# Altium PCB extension.PcbDoc (part 2 of 3)
Units mil, origin at the board's own origin, x right, y up, seen from the top; angles counter-clockwise.
Board outline 6141.73 x 4724.41 mil, 4 copper layers (Top Copper, Supply, GND, Bot Copper), stack 61.417 mil thick; 231 components, 147 nets, 660 pads, 234 vias.
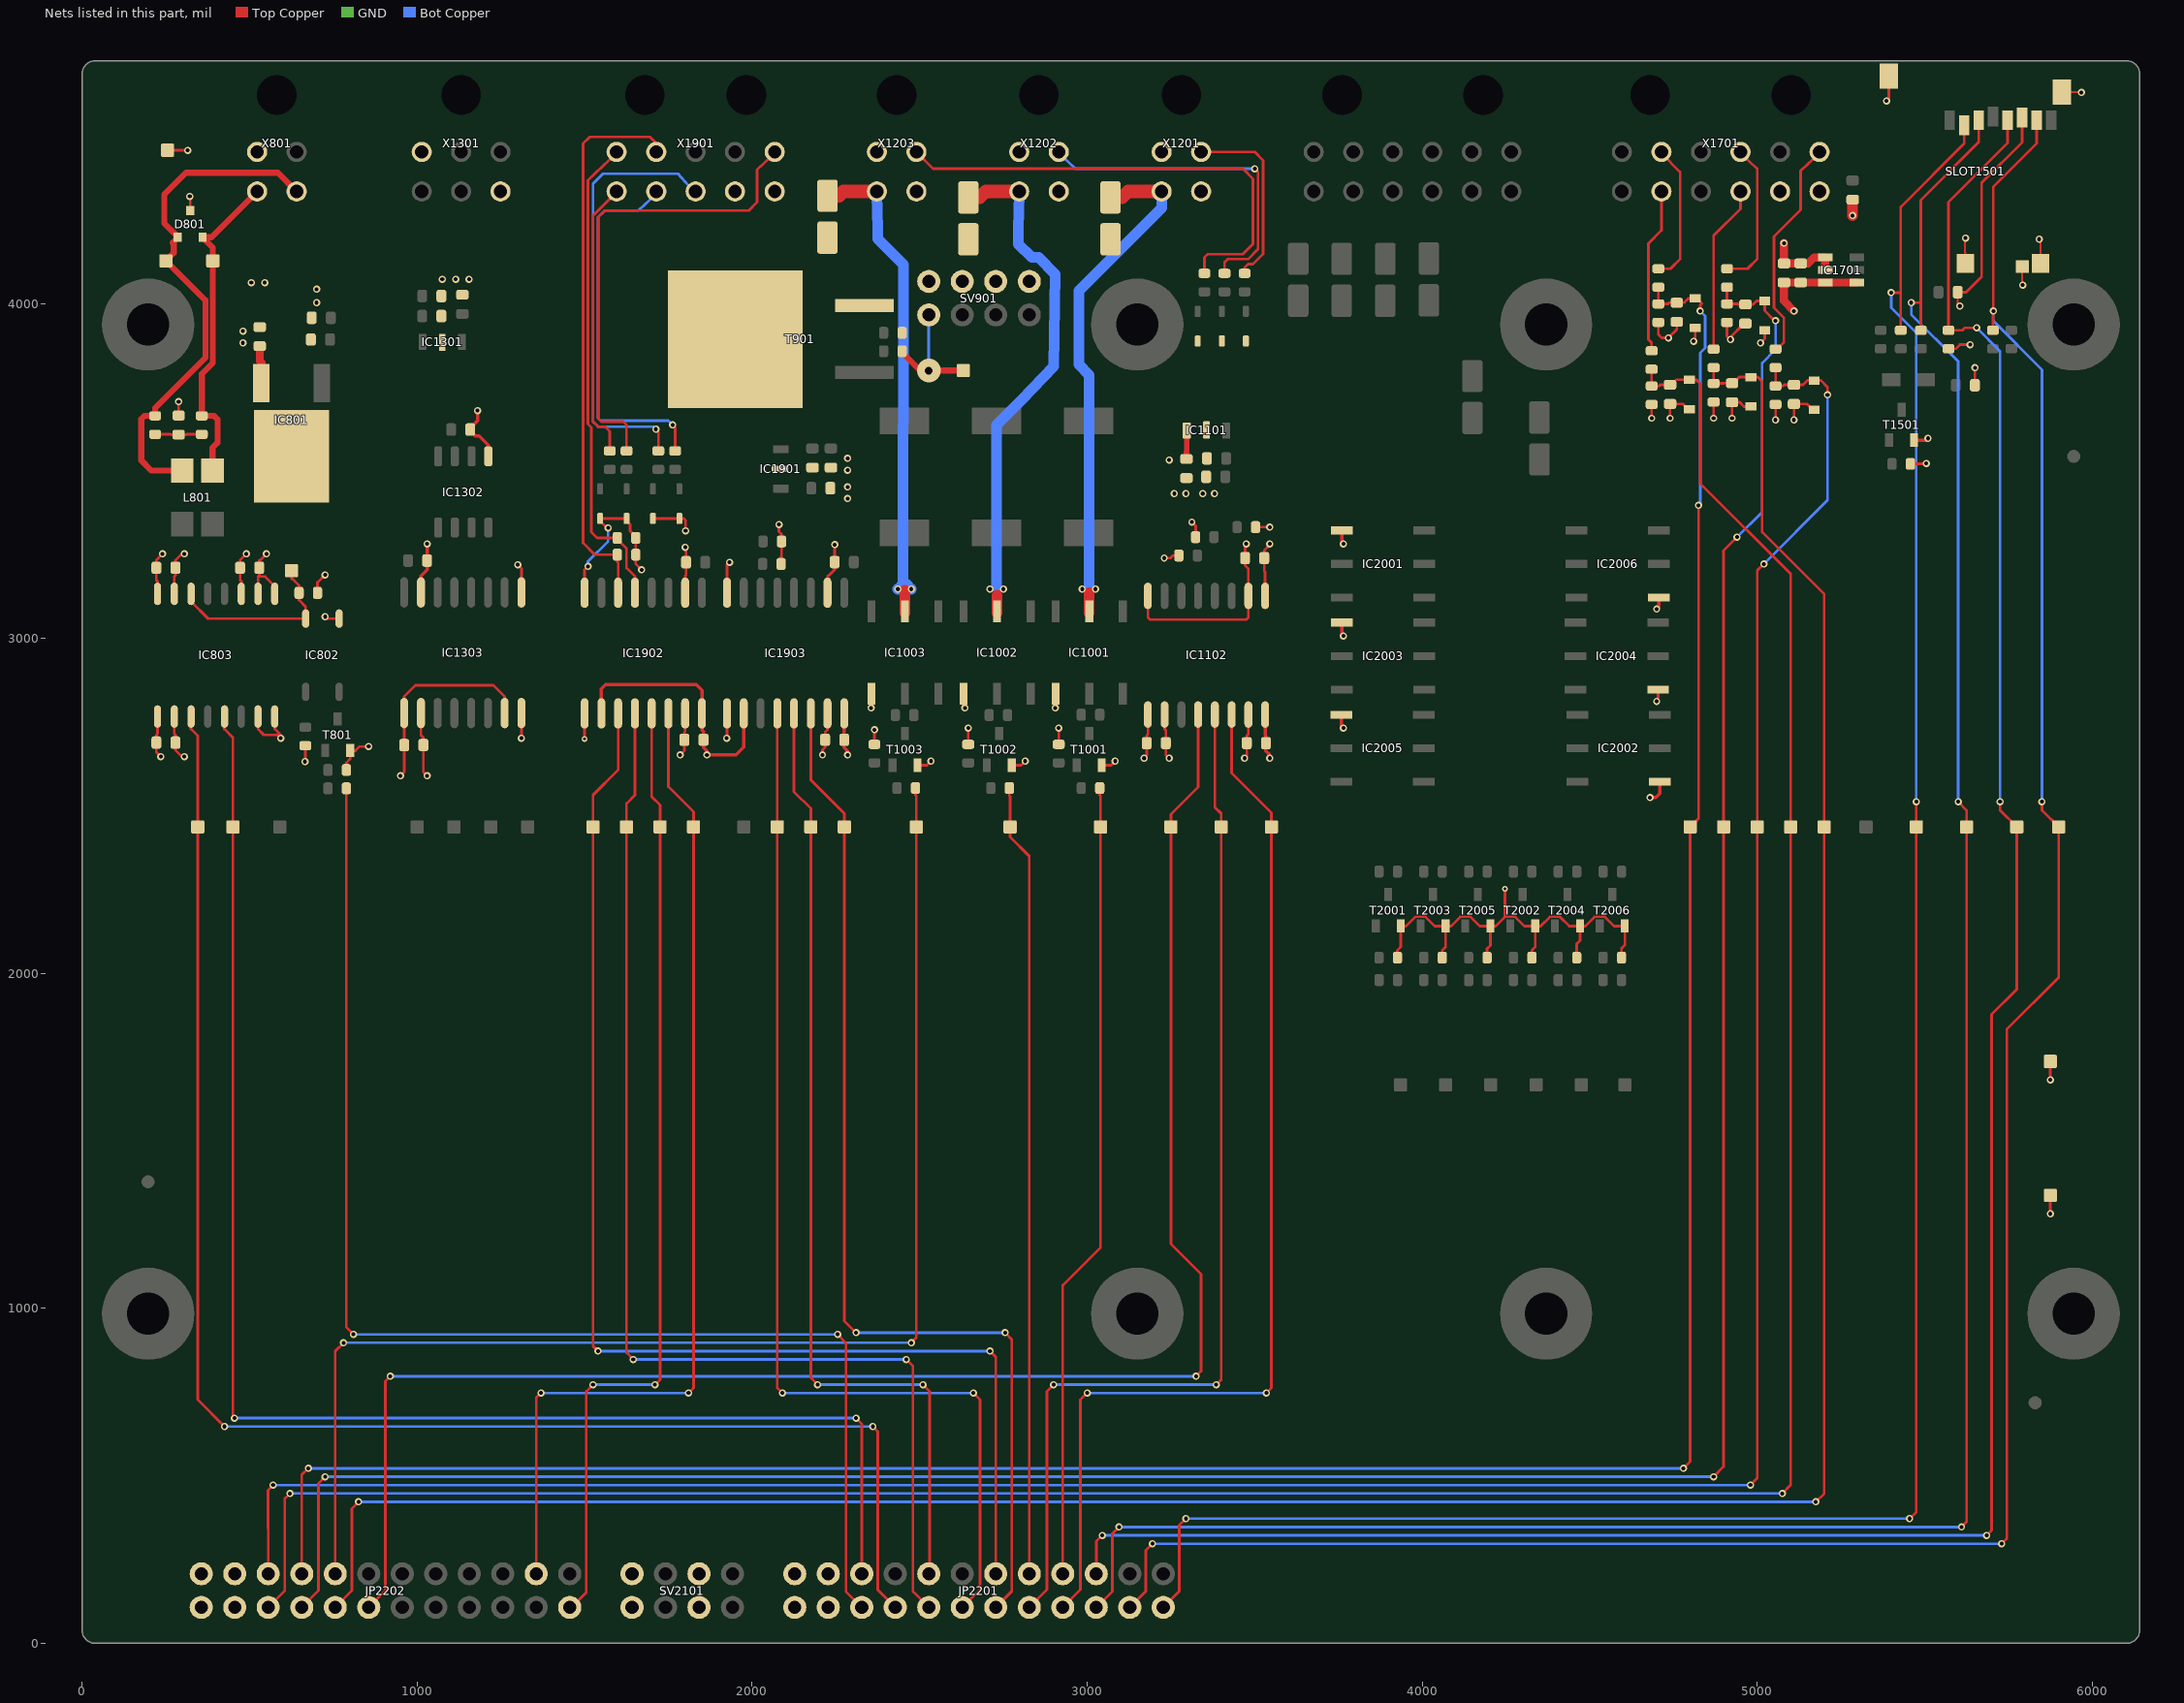
[diagram p4: the nets of this part, all layers, seen from the top]

## Part data
C801 C1102 C1301 C1502 C1703 C1902: library part gen_C_ceramic_1u_50V_X7R_0603, "MLCC", Capacitance=1u, Case EIA=0603, Case Metric=1608, Dielectric=X7R, Operating Temperature="-55°C - +125°C", Rated Voltage=50V, Supplier Part Number 1=2779055, Tolerance="± 10%", Part Number=gen_C_ceramic_1u_50V_X7R_0603, Supplier 1=Farnell
C802 C803 C805 C806 C807 C1101 C1103 C1104 C1105 C1106 C1302 C1303 C1304 C1305 C1306 C1501 C1701 C1702 C1704 C1705 C1706 C1707 C1708 C1901 C1903 C1904 C1905 C1906 C1907: library part gen_C_ceramic_100n_50V_X7R_0603, "MLCC", Capacitance=100n, Case EIA=0603, Case Metric=1608, Dielectric=X7R, PnP Package=C_0603_10, PnP Value=100n/50V/X7R, Rated Voltage=50V, Supplier Part Number 1=2525267, Part Number=gen_C_ceramic_100n_50V_X7R_0603, PnP equipped=x, Supplier 1=Farnell
C804: library part gen_C_ceramic_4n7_50V_X7R_0603, "MLCC", Capacitance=4n7, Case EIA=0603, Case Metric=1608, Dielectric=X7R, PnP Package=C_0603_05, Rated Voltage=50V, Supplier Part Number 1=2904754, Automotive Qualified=True, Part Number=gen_C_ceramic_4n7_50V_X7R_0603, Supplier 1=Farnell
D801: library part CMP-2000-04916-1, "CAN Bus ESD Protection Diode, 200 W, 24 V, -65 to 150 degC, 3-Pin SOT23, RoHS, Tape and Reel", Breakdown Voltage=27.8V, Breakdown Voltage Max=30.3V, Breakdown Voltage Min=25.4V, Breakdown Voltage Range=25.4Vto30.3V, Capacitance Cd @ Vr Max=17pF, Capacitance Cd @ Vr Typ=11pF, Clamping Voltage @ 8/20µs Max=70V, Diode Case Style=SOT-23, Manufacturer="NXP Semiconductors", Operating Temperature Max=150degC, Operating Temperature Min=-65degC, Operating Temperature Range=-65degCto+150degC, Peak Pulse Current Ippm=3A, Peak Pulse Power=200W, Reverse Stand-Off Voltage Vrwm=24V, Breakover Voltage Min=25.4V, Clamping Voltage Vc Max=70V, Datasheet URL=https://datasheet.ciiva.com/22692/109497-22692467.pdf, Datasheet Version="Rev. 04, 02/2008", Diode Configuration=Bidirectional, Diode Type=BidirectionalTVS, Manufacturer URL=http://www.nxp.com/, No. of Pins=3, Package / Case=SOT-23, SMD Marking=AN, Stand-off Voltage=24V, SVHC=NoSVHC(20-Jun-2013), Termination Type=SMD, TVS Polarity=Bidirectional
D1001 D1002 D1003 D2001 D2002 D2003 D2004 D2005 D2006: "Standard Recovery Diode, 100 V, 1 A, Single, 1 V, 2 µs, 30 A", Breakdown Voltage=100V, Continuous Forward Current=1A, Manufacturer="ON Semiconductor", Operating Temperature="-65°C - +175°C", Part Name=GF1B, Supplier Part Number 1=1467477, ComponentLink1Description=Datasheet, ComponentLink1URL=http://www.farnell.com/datasheets/2303965.pdf, Part Number=d_si_sma_1A, Supplier 1=Farnell
D1101 D1102 D1103 D1901 D1902 D1903 D1904: "TVS Diode, CDSOD323 Series, Unidirectional, 5 V, 18.3 V, SOD-323, 2 Pins", Breakdown Voltage=6V, Manufacturer=Bourns, Operating Temperature="-55°C - +150°C", Supplier Part Number 1=2341914, ComponentLink1Description=Datasheet, ComponentLink1URL=http://www.farnell.com/datasheets/1845299.pdf, Part Name=CDSOD323-T05, Part Number=CDSOD323-T05, Supplier 1=Farnell
D1701 D1702 D1703 D1704 D1705: library part CMP-1060-00652-1, "Zener Voltage Regulator, 300 mW, Tight Tolerance Portfolio, 2-Pin SOD-323, Pb-Free, Tape and Reel", Manufacturer="On Semiconductor", ComponentLink1Description="Manufacturer URL", ComponentLink1URL=http://www.onsemi.com/, ComponentLink2Description=Datasheet, ComponentLink2URL=http://www.onsemi.cn/pub_link/Collateral/MM3Z2V4ST1-D.PDF, ComponentLink3Description="Package Specification", ComponentLink3URL=http://www.onsemi.com/pub_link/Collateral/477-02.PDF.1, DatasheetVersion="Rev. 21", Mounting Technology="Surface Mount", PackageDescription="2-Pin SOD, Body 1.7 x 1.25 mm", PackageReference=SOD-323-2-477-02, PackageVersion="Rev. H, 03/2007", Packing="Tape and Reel", PartNumber=MM3Z3V3ST1G, P Max (W)=0.3, RoHS=Pb-Free
Designator24: library part Layer_Marker_4_Layers
Designator30 Designator31 Designator32 Designator33 Designator34 Designator35 Designator36 Designator37: library part Hole_3.2_Iso
F1001 F1002 F1003: library part fuse_4A_3403.0172.11, Manufacturer=Schurter, Operating Temperature="-55°C - +125°C", Supplier Part Number 1=486-1253-ND, ComponentLink1Description="Catalog Page Digikey", ComponentLink1URL=http://dkc3.digikey.com/PDF/DE2011-DE/P2352.pdf, Part Number=fuse_4A_3403.0172.11, Supplier 1=Digikey, Supplier 2=Mouser, Supplier Part Number 2=693-3403.0172.11
FD1 FD2 FD3: library part Fiducial_2, "Fiducial (Round)", PnP Package=FD, PnP Value=Fiducial2, Part Number=Fiducial_2
IC801: library part KA7805ERTF, "3-Terminal 1 A Positive Voltage Regulator", Manufacturer=Fairchild, Operating Temperature="-40°C - +125°C", Supplier Part Number 1=2102585, ComponentLink1Description=Datasheet, ComponentLink1URL=http://www.farnell.com/datasheets/2299720.pdf, Part Name=KA7805ERTF, Part Number=KA7805ERTF, Supplier 1=Farnell
IC802: "Single-Pole, Normally Open 4-Pin SOP OptoMOS Relay", Manufacturer=CLARE, Operating Temperature="-40°C - +85°C", Supplier Part Number 1=1653755, ComponentLink1Description=Datasheet, ComponentLink1URL=http://www.farnell.com/datasheets/1924621.pdf, Part Name=CPC1008N, Part Number=CPC1008N, Supplier 1=Farnell
IC803: library part CMP-2000-07246-1, "Galvanically Isolated High-Speed CAN Transceiver, -40 to 125 degC, 16-Pin SOIC, RoHS, Tape and Reel", Manufacturer=NXPSemiconductors, Maximum Single Supply Voltage=5.25V, Minimum Single Supply Voltage=3, Package=16SOIC, Package Description="16-Pin Small Outline Integrated Circuit, Body 10.3 x 7.5 mm, Pitch 1.27 mm", Package Reference=SOT162-1, Power Down Mode=Standby, Category=Transceiver, Datasheet URL=http://www.nxp.com/documents/data_sheet/TJA1052I.pdf, Datasheet Version="Rev. 3, 01/2015", Manufacturer URL=http://www.nxp.com/, Maximum Data Rate=1Mbps, Mounting Technology=SurfaceMount, Number of Transceivers=1, Packaging=Tape&Reel, Rad Hard=No, Standard Supported=ISO11898-2
IC1001 IC1002 IC1003 IC2001 IC2002 IC2003 IC2004 IC2005 IC2006: "PhotoMOS Relay", Manufacturer=Panasonic, Operating Temperature="-40°C - +85°C", Supplier Part Number 1=255-3594-1-ND, Part Name=AQV252G2SX, Part Number=AQV252G2SX, Supplier 1=Digikey, Supplier 2=Farnell, Supplier Part Number 2=2302216
IC1101 IC1301 IC1901: library part CMP-2000-07341-1, "Positive-Voltage Regulator, 100 mA, 0 to 125 degC, 3-Pin SOT-89 (PK), Green (RoHS & no Sb/Br), Tape and Reel", Input Voltage MAX=20V, Input Voltage MIN=7V, Manufacturer=TexasInstruments, Maximum Operating Temperature=+125C, Minimum Operating Temperature=0C, Output Current=100mA, Output Voltage=5V, Package / Case=SOT-89-4, Package Description="3-Pin Small Outline Transistor, Body 4.5 x 2.5 mm, Pitch 1.5 mm", Package Reference=PK0003A, Brand=TexasInstruments, Datasheet URL=http://www.ti.com/lit/ds/symlink/ua78l05.pdf, Datasheet Version="Rev. U, 05/2011", Line Regulation=200mV, Load Regulation=60mV, Manufacturer URL=http://www.ti.com/, Mounting Style=SMD/SMT, Mounting Technology=SurfaceMount, Number of Outputs=1, Output Type=Fixed, Package URL=http://www.ti.com/lit/ml/mhsi001b/mhsi001b.pdf, Packaging=Reel, Polarity=Positive, Product Category=LinearVoltageRegulators, PSRR / Ripple Rejection - Typ=49dB, RoHS=True, Series=UA78L05
IC1102: library part CMP-0534-00476-1, "Triple Channel Digital Isolator, Enhanced System-Level ESD Reliability, 2.5 KV rms Insulation Rating, 90 Mbps Data Rate, 32 ns Delay, Industrial, 16-pin SOIC (RW-16), Tube", Insulation Rating (kVrms)=2.5, Manufacturer="Analog Devices", Max Operating Temp (degreesC)=105, Code_JEDEC=MS-013-AA, ComponentLink1Description="Manufacturer URL", ComponentLink1URL=http://www.analog.com/en/index.html, ComponentLink2Description=Datasheet, ComponentLink2URL=http://www.analog.com/static/imported-files/data_sheets/ADUM3300_3301.pdf, ComponentLink3Description="Package Specification", ComponentLink3URL=http://www.analog.com/static/imported-files/packages/PKG_PDF/SOIC_WIDE%20%28RW%29/RW_16.pdf, ComponentLink4Description="URL Link1", ComponentLink4URL="Product URL:http://www.analog.com/en/interface-isolation/digital-isolators/adum3300/products/product.html", DatasheetVersion="Rev. B", Max Data Rate=90Mbps, Mounting Technology="Surface Mount", PackageDescription="16-Pin Standard Small Outline Package, Body 10.3 x 7.5 mm, Pitch 1.27 mm", PackageReference=RW-16, PackageVersion="032707-B, 03/2007", PartNumber=ADUM3300CRWZ
IC1302: library part LT1785CS8#PBF, "Transceiver RS422/RS485, Fault Protected, 4.75V-5.25V supply, SOIC-8", Manufacturer="Linear Technology", Operating Temperature="0°C - 70°C", Part Name=LT1785CS8, Supplier Part Number 1=1663498, ComponentLink1Description=Datasheet, ComponentLink1URL=http://www.farnell.com/datasheets/1905888.pdf, Part Number=LT1785CS8#PBF, Supplier 1=Farnell
IC1303: library part CMP-0534-00405-1, "Quad Channel Digital Isolator, Enhanced System-Level ESD Reliability, 2.5 KV rms Insulation Rating, 90 Mbps Data Rate, 32 ns Delay, Industrial, 16-pin SOIC (RW-16), Tube", Insulation Rating (kVrms)=2.5, Manufacturer="Analog Devices", Max Operating Temp (degreesC)=105, Code_JEDEC=MS-013-AA, ComponentLink1Description="Manufacturer URL", ComponentLink1URL=http://www.analog.com/en/index.html, ComponentLink2Description=Datasheet, ComponentLink2URL=http://www.analog.com/static/imported-files/data_sheets/ADUM3400_3401_3402.pdf, ComponentLink3Description="Package Specification", ComponentLink3URL=http://www.analog.com/static/imported-files/packages/PKG_PDF/SOIC_WIDE%20%28RW%29/RW_16.pdf, ComponentLink4Description="URL Link1", ComponentLink4URL="Product URL:http://www.analog.com/en/interface-isolation/digital-isolators/adum3401/products/product.html", DatasheetVersion="Rev. B", Max Data Rate=90Mbps, Mounting Technology="Surface Mount", PackageDescription="16-Pin Standard Small Outline Package, Body 10.3 x 7.5 mm, Pitch 1.27 mm", PackageReference=RW-16, PackageVersion="032707-B, 03/2007", PartNumber=ADUM3401CRWZ
IC1701: library part CMP-0784-00366-1, "Micropower, High Accuracy Voltage Reference, 2.5 V Output, 2.7 to 5.5 V Supply, Industrial, 6-pin SOT23 (RJ-6), Reel", Manufacturer="Analog Devices", Operating Temp Range="-40 to 125 degC", Code_JEDEC=MO-178-AB, ComponentLink1Description="Manufacturer URL", ComponentLink1URL=http://www.analog.com/en/index.html, ComponentLink2Description=Datasheet, ComponentLink2URL=http://www.analog.com/static/imported-files/data_sheets/ADR3412_ADR3420_ADR3425_ADR3430_ADR3433_ADR3440_ADR3450.pdf, ComponentLink3Description="Package Specification", ComponentLink3URL=http://www.analog.com/static/imported-files/packages/PKG_PDF/SOT-23(RJ)/RJ_6.pdf, ComponentLink4Description="URL Link1", ComponentLink4URL="Product URL:http://www.analog.com/en/special-linear-functions/voltage-references/adr3425/products/product.html", DatasheetVersion="Rev. B", Max V Supply (V)=5.5, Min V Supply (V)=2.7, Mounting Technology="Surface Mount", PackageDescription="6-Pin Small Outline Transistor Package, Body 2.9 x 1.6 mm, Pitch 0.95 mm", PackageReference=RJ-6, PackageVersion="121608-A, 12/2008", Packing=Reel, PartNumber=ADR3425ARJZ-R2, Ref Out TC (ppm/C)=2.5, Vout=2.5V
IC1902 IC1903: library part CMP-0534-00413-1, "Quad Channel Digital Isolator, Enhanced System-Level ESD Reliability, 2.5 KV rms Insulation Rating, 10 Mbps Data Rate, 50 ns Delay, Industrial, 16-pin SOIC (RW-16), Tube", Insulation Rating (kVrms)=2.5, Manufacturer="Analog Devices", Max Operating Temp (degreesC)=105, Code_JEDEC=MS-013-AA, ComponentLink1Description="Manufacturer URL", ComponentLink1URL=http://www.analog.com/en/index.html, ComponentLink2Description=Datasheet, ComponentLink2URL=http://www.analog.com/static/imported-files/data_sheets/ADUM3400_3401_3402.pdf, ComponentLink3Description="Package Specification", ComponentLink3URL=http://www.analog.com/static/imported-files/packages/PKG_PDF/SOIC_WIDE%20%28RW%29/RW_16.pdf, ComponentLink4Description="URL Link1", ComponentLink4URL="Product URL:http://www.analog.com/en/interface-isolation/digital-isolators/adum3402/products/product.html", DatasheetVersion="Rev. B", Max Data Rate=10Mbps, Mounting Technology="Surface Mount", PackageDescription="16-Pin Standard Small Outline Package, Body 10.3 x 7.5 mm, Pitch 1.27 mm", PackageReference=RW-16, PackageVersion="032707-B, 03/2007", PartNumber=ADUM3402BRWZ
JP2201 JP2202: library part samtec_TLW-112-06-G-D, "Board-To-Board Connector, Vertical, Low Profile, 2.54 mm, 24 Contacts, Header, TLW Series, Through Hole, 2 Rows", Manufacturer=Samtec, Operating Temperature="-55°C - +125°C", Part Name=TLW-112-06-G-D, Supplier Part Number 1=SAM1096-12-ND, Circuits=24, ComponentLink1Description=Datasheet, ComponentLink1URL=http://suddendocs.samtec.com/catalog_english/tlw_th.pdf, Part Number=samtec_TLW-112-06-G-D, Supplier 1=Digikey
L801: library part B82789N, "Common Mode Choke", Manufacturer="EPCOS / TDK", Operating Temperature="-55°C - +150°C", Rated Current=250mA, Supplier Part Number 1=871-B82789C0513H002, ComponentLink1Description=Datasheet, ComponentLink1URL=https://www.mouser.com/ds/2/400/b82789c0_s0-1220172.pdf, Inductance=51uH, Part Number=B82789N, Supplier 1=Mouser
L1501: library part CMP-0686-00649-2, "Chip Ferrite Bead for General Signal lines, 470 Ohm, 700 mA, -55 to 125 degC, 2 x 1.25 x 1.05 mm SMD, Tape and Reel", DC Resistance="0.19 Ohm Max.", Manufacturer=Murata, Operating Temperature Range="-55 to 125 degC", Rated Current="700 mA", ComponentLink1Description="Manufacturer URL", ComponentLink1URL=http://www.murata.com/, ComponentLink2Description=Datasheet, ComponentLink2URL=http://www.murata.com/products/catalog/pdf/c31e.pdf, ComponentLink3Description="Package Specification", ComponentLink3URL=http://www.murata.com/products/catalog/pdf/c31e.pdf, DatasheetVersion=08/2013, Impedance (at 100 MHz)="470 Ohm +/- 25%", Mounting Technology="Surface Mount", PackageDescription="2-Pin Chip, Body 2 x 1.25 mm", PackageReference=BLM21_H1050-2, Packing="Tape and Reel", PartNumber=BLM21AG471SN1J
LSP801 LSP802 LSP803 LSP804 LSP805 LSP806 LSP807 LSP901 LSP1001 LSP1002 LSP1003 LSP1101 LSP1102 LSP1103 LSP1301 LSP1302 LSP1303 LSP1304 LSP1501 LSP1502 LSP1503 LSP1504 LSP1505 LSP1701 LSP1702 LSP1703 LSP1704 LSP1705 LSP1901 LSP1902 LSP1903 LSP1904 LSP1905 LSP1906 LSP1907 LSP1908 LSP2001 LSP2002 LSP2003 LSP2004 LSP2005 LSP2006 LSP2101 LSP2102: "Testpoint, square", Part Number=Testpoint_Square
R801 R802: library part gen_R_62R_0603, "SMD Resistor 62R 0603", Case EIA=0603, Case Metric=1608, Maximum Working Voltage=75V, Operating Temperature="-55°C - +155°C", PnP Package=R_0603, Power=0.1W, Supplier Part Number 1=2073943, Tolerance=1%, Part Number=gen_R_62R_0603, PnP Value=62R, Resistance=62R, Series=E24, Supplier 1=Farnell
R803 R805 R901 R1002 R1005 R1008 R1104 R1105 R1106 R1502 R1503 R1504 R1505 R1506 R1507 R1903 R1904 R1907 R1908 R2003 R2004 R2009 R2010 R2015 R2016: library part gen_R_10k_0603, "SMD Resistor 10k 0603", Case EIA=0603, Case Metric=1608, Maximum Working Voltage=75V, Operating Temperature="-55°C - +155°C", PnP Package=R_0603, Power=0.1W, Supplier Part Number 1=2073349, Tolerance=1%, Part Number=gen_R_10k_0603, PnP Value=10k, Resistance=10k, Series="E24, E96", Supplier 1=Farnell
R804 R1003 R1006 R1009 R2005 R2006 R2011 R2012 R2017 R2018: library part gen_R_430R_0603, "SMD Resistor 430R 0603", Case EIA=0603, Case Metric=1608, Maximum Working Voltage=75V, Operating Temperature="-55°C - +155°C", PnP Package=R_0603, Power=0.1W, Supplier Part Number 1=2074259, Tolerance=1%, Part Number=gen_R_430R_0603, PnP Value=430R, Resistance=430R, Series=E24, Supplier 1=Farnell
R806 R902 R1001 R1004 R1007 R2001 R2002 R2007 R2008 R2013 R2014: library part gen_R_10R_0603, "SMD Resistor 10R 0603", Case EIA=0603, Case Metric=1608, Maximum Working Voltage=75V, Operating Temperature="-55°C - +155°C", PnP Package=R_0603, Power=0.1W, Supplier Part Number 1=2073361, Tolerance=1%, Part Number=gen_R_10R_0603, PnP Value=10R, Resistance=10R, Series="E24, E96", Supplier 1=Farnell
R1101 R1102 R1103 R1901 R1902 R1905 R1906: library part gen_R_47R_0603, "SMD Resistor 47R 0603", Case EIA=0603, Case Metric=1608, Maximum Working Voltage=75V, Operating Temperature="-55°C - +155°C", PnP Package=R_0603, Power=0.1W, Supplier Part Number 1=2303030, Tolerance=1%, Part Number=gen_R_47R_0603, PnP Value=47R, Resistance=47R, Series=E24, Supplier 1=Farnell
R1501: library part gen_R_47k_0603, "SMD Resistor 47k 0603", Case EIA=0603, Case Metric=1608, Maximum Working Voltage=75V, Operating Temperature="-55°C - +155°C", PnP Package=R_0603, Power=0.1W, Supplier Part Number 1=2073510, Tolerance=1%, Part Number=gen_R_47k_0603, PnP Value=47k, Resistance=47k, Series=E24, Supplier 1=Farnell
R1701 R1703 R1705 R1707 R1709: library part gen_R_0R_0603, "SMD Resistor 0R 0603", Case EIA=0603, Case Metric=1608, Maximum Working Voltage=75V, Operating Temperature="-55°C - +155°C", PnP Package=R_0603, Power=0.1W, Supplier Part Number 1=2073345, Part Number=gen_R_0R_0603, PnP Value=0R, Resistance=0R, Series=Jumper, Supplier 1=Farnell
R1702 R1704 R1706 R1708 R1710: library part gen_R_4k75_0603, "SMD Resistor 4k75 0603", Case EIA=0603, Case Metric=1608, Maximum Working Voltage=75V, Operating Temperature="-55°C - +155°C", PnP Package=R_0603, Power=0.1W, Supplier Part Number 1=2073517, Tolerance=1%, Part Number=gen_R_4k75_0603, PnP Value=4k75, Resistance=4k75, Series=E96, Supplier 1=Farnell
SLOT1501: "1.10mm Pitch Memorycard Card Connector, Push-Push Type, with VSS (Supply Voltage Ground) Detect Switch, Lead-Free", Manufacturer=Molex, Operating Temperature="-20°C - +85°C", Part Name=47352-1001, Rated Current=0.5A, Rated Voltage="100V DC", Supplier Part Number 1=2424133, Automotive Qualified=False, Circuits=10, ComponentLink1Description=Drawing, ComponentLink1URL=http://www.molex.com/pdm_docs/sd/473521001_sd.pdf, Part Number=molex_47352-1001, Supplier 1=Farnell
SV901 SV2101: "Board-To-Board Connector, Vertical, Low Profile, 2.54 mm, 8 Contacts, Header, TLW Series, Through Hole, 2 Rows", Manufacturer=Samtec, Operating Temperature="-55°C - +125°C", Part Name=TLW-104-06-G-D, Supplier Part Number 1=SAM1096-04-ND, Circuits=8, ComponentLink1Description=Datasheet, ComponentLink1URL=http://suddendocs.samtec.com/catalog_english/tlw_th.pdf, Part Number=samtec_TLW-104-06-G-D, Supplier 1=Digikey
T801 T1001 T1002 T1003 T2001 T2002 T2003 T2004 T2005 T2006: "MOSFET-Transistor, n-Kanal, 1.6 A, 100 V, 0.178 ohm, 10 V, 2.5 V", Manufacturer=Infineon, Maximum Continous Drain Current (25°C)=1.6A, Maximum Drain-Source Voltage=100V, Operating Temperature="-55°C - +150°C", Part Name=NMOS, Supplier Part Number 1=1783928, ComponentLink1Description="Datasheet URL", ComponentLink1URL=http://www.farnell.com/datasheets/491501.pdf, Part Number=IRLML0100TRPBF, R_DS(on)=190m, Supplier 1=Farnell, Total Gate Charge=2.5nC
T901: library part CMP-1259-00124-1, "N-Channel TrenchMOS Logic Level FET, 60 V, 100 A, 3-Pin SOT404, Tape and Reel", Manufacturer="NXP Semiconductors", Automotive Qualified=Y, Channel Type=N, ComponentLink1Description="Manufacturer URL", ComponentLink1URL=http://www.nxp.com/, ComponentLink2Description=Datasheet, ComponentLink2URL=http://www.nxp.com/documents/data_sheet/BUK964R8-60E.pdf, ComponentLink3Description="Package Specification", ComponentLink3URL=http://www.nxp.com/documents/outline_drawing/sot404_po.pdf, ID [max] (A)=100, IDM [max] (A)=596, Mounting Technology="Surface Mount", PackageDescription="3-Pin Plastic Single-ended Surface Mounted Package, Body 10 x 9.6 mm, Pitch 2.54 mm", PackageReference=SOT404, PackageVersion="13-02-25, 02/2013", Packing="Tape & Reel", PartNumber=BUK964R8-60E,118, Qr [typ] (nC)=56, VDS [max] (V)=60, VGSth [typ] (V)=1.7
T1501: library part CMP-1099-00028-1, "P-Channel SIPMOS Small-Signal-Transistor, -60 V VDS, -0.17 A ID, -55 to 150 degC, PG-SOT23, Reel, Green", Manufacturer=Infineon, ComponentLink1Description="Manufacturer URL", ComponentLink1URL=http://www.infineon.com/, ComponentLink2Description=Datasheet, ComponentLink2URL=http://www.infineon.com/dgdl/BSS84P_Rev2.7%5B1%5D.pdf?folderId=db3a304314dca38901154a72e3951a65&fileId=db3a304330f68606013118ac7a9b4549, ComponentLink3Description="Package Specification", ComponentLink3URL=http://www.infineon.com/dgdl/SOT23-Package_Overview.pdf?folderId=db3a30431936bc4b0119532290053c66&fileId=db3a30431936bc4b0119533468123c85, DatasheetVersion="Rev. 2.7", Green=TRUE, Halogen-free=TRUE, ID (max)="-0.17 A", IDpuls (max)="-0.68 A", Mounting Technology="Surface Mount", PackageDescription="3-Pin Small Outline Transistor Package, 2.9 x 1.3 mm Body, 0.95 mm Pitch", PackageReference=PG-SOT23, PackageVersion=Apr-08, Packing=Reel, PartNumber=BSS84P, Pto t (max)="0.36 W", QG="1 nC", RDS (on) (max)="8,000 mOhm", RDS (on) (max) (@4.5V)="12,000 mOhm", Rth="350 K/W", VDS (max)="-60 V", VGS(th) (max)="-2 V", VGS(th) (min)="-1 V"
X801 X1201 X1202 X1203: "Micro-Fit 3.0 Right Angle Header, 3.00mm Pitch, Dual Row, 4 Circuits, with Snap-in Plastic Peg PCB Lock, Tin, Glow Wire Capable, Black, 43045-0400", Manufacturer=Molex, Operating Temperature="-40°C - +105°C", Part Name=MicroFit, Rated Current=8.5A, Rated Voltage=600V, Supplier Part Number 1=9733019, Circuits=4, Part Number=molex_microfit_3_02x2_THT, Supplier 1=Farnell
X1301: "Micro-Fit 3.0 Right Angle Header, 3.00mm Pitch, Dual Row, 6 Circuits, with Snap-in Plastic Peg PCB Lock, Tin, Glow Wire Capable, Black, 43045-0600", Manufacturer=Molex, Operating Temperature="-40°C - +105°C", Part Name=MicroFit, Rated Current=8.5A, Rated Voltage=600V, Supplier Part Number 1=1012252, Circuits=6, Part Number=molex_microfit_3_03x2_THT, Supplier 1=Farnell
X1701 X2001: "Micro-Fit 3.0 Right Angle Header, 3.00mm Pitch, Dual Row, 12 Circuits, with Snap-in Plastic Peg PCB Lock, Tin, Glow Wire Capable, Black, 43045-1200", Manufacturer=Molex, Operating Temperature="-40°C - +105°C", Part Name=MicroFit, Rated Current=8.5A, Rated Voltage=600V, Supplier Part Number 1=9732977, Circuits=12, Part Number=molex_microfit_3_06x2_THT, Supplier 1=Farnell
X1901: "Micro-Fit 3.0 Right Angle Header, 3.00mm Pitch, Dual Row, 10 Circuits, with Snap-in Plastic Peg PCB Lock, Tin, Glow Wire Capable, Black, 43045-1000", Manufacturer=Molex, Operating Temperature="-40°C - +105°C", Part Name=MicroFit, Rated Current=8.5A, Rated Voltage=600V, Supplier Part Number 1=1012255, Circuits=10, Part Number=molex_microfit_3_05x2_THT, Supplier 1=Farnell

## Via types
v1: diameter 21.65, hole 11.81, Top Copper to Bot Copper, tented both sides, 231 vias
v2: diameter 17.72, hole 8, Top Copper to Bot Copper, 2 vias
v3: diameter 35.43/70.86/70.86/35.43 (per signal layer), hole 23.62, Top Copper to Bot Copper, 1 vias

## Nets (pads, with @x,y where several pads share a name; then routed paths per layer and width w, separated by ;. In a path a pad name is that pad's centre, name@x,y a point inside that pad or via, vN(x,y) a via of type N, cw(c..) or ccw(c..) an arc to the next point about the centre after c; other vN are vias at no path point)
+3.3V_0: C807.2 C1105.1 C1106.1 C1306.1 C1703.1 C1704.1 C1905.1 C1907.1 IC803.1 IC1001.1 IC1002.1 IC1003.1 IC1102.10 IC1102.16 IC1303.1 IC1303.7 IC1701.3 IC1701.4 IC1902.10 IC1902.16 IC1903.10 IC1903.16 IC2001.1 IC2002.1 IC2003.1 IC2004.1 IC2005.1 IC2006.1 JP2201.21 JP2201.23 JP2202.21 JP2202.23 LSP2101.1 R804.1 R1501.2 SV2101.7 T1501.2 | length 2865.7
  Top Copper w8: IC803.1@225,2766.93 225,2715.25 221.46,2711.71 C807.2@221.46,2689.01 221.46,2660.94 v1(235,2647.4) ; v1(665,2632.4) 666.26,2633.66 R804.1@666.26,2676.4 ; v1(950,2590) 961.46,2601.46 C1306.1@961.46,2681.64 961.46,2727.8 961.25,2728.01 IC1303.1@961.25,2777.28 961.25,2826.56 994.69,2860 1227.81,2860 1261.25,2826.56 IC1303.7@1261.25,2777.28 ; v1(2355,2792.4) 2356.26,2793.66 IC1003.1@2356.26,2834.37 IC1003.1@2356.26,2839.29 ; IC1002.1@2631.26,2839.29 IC1002.1@2631.26,2834.37 2631.26,2796.14 v1(2635,2792.4) ; v1(2905,2792.4) 2906.26,2793.66 IC1001.1@2906.26,2834.37 IC1001.1@2906.26,2839.29 ; IC1102.10@3231.25,2772.73 3231.25,2729.36 3234.8,2725.81 C1105.1@3234.8,2687.4 3234.8,2652.6 v1(3245,2642.4) ; R1501.2@5461,3521.14 5503.74,3521.14 v1(5505,3522.4) ; v1(5875,1682.4) LSP2101.1@5875,1737.4
  Top Copper w10: IC1902.10@1550,2776.03 1550,2849 1563,2862 1833,2862 1850,2845 IC1902.16@1850,2776.03 1850,2726.76 1854.8,2721.95 C1905.1@1854.8,2697.4 1854.8,2674.7 1865,2664.5 v1(1865,2652.4) 1951.4,2652.4 1975,2676 IC1903.10@1975,2776.03 ; IC1903.16@2275,2776.03 2275,2720.3 2274.8,2720.1 C1907.1@2274.8,2697.4 2274.8,2674.7 2285,2664.5 v1(2285,2652.4) ; IC1102.16@3531.25,2772.73 3531.25,2712.39 3533.54,2710.1 C1106.1@3533.54,2687.4 3533.54,2664.7 3545,2653.24 v1(3545,2642.4) ; IC2005.1@3758.23,2772.4 3758.23,2739.17 v1(3765,2732.4) ; IC2003.1@3760.71,3047.4 3760.71,3011.69 v1(3765,3007.4) ; IC2001.1@3760.71,3322.4 3760.71,3286.69 v1(3765,3282.4) ; v1(4680,2525) 4697.6,2525 4709.29,2536.69 IC2002.1@4709.29,2572.4 ; v1(4700,2812.4) 4704.29,2816.69 IC2004.1@4704.29,2847.4 ; v1(4700,3087.4) 4706.77,3094.17 IC2006.1@4706.77,3122.4 ; T1501.2@5468.66,3592.12 5504.72,3592.12 v1(5510,3597.4)
  Top Copper w24: v1(5110,3977.4) 5080,4007.4 C1704.1@5080,4062.6 C1703.1@5130,4062.6 5271.83,4062.6 IC1701.4@5297.49,4062.6
+5.0V_0: SV2101.8
ADC_MCU_0_CH_0: C1701.1 D1701.1 JP2202.18 LSP1701.1 R1701.2 R1702.1 | length 8132.9
  Top Copper w8: JP2202.18@655.51,207.48 655.51,502.91 v1(675,522.4) ; R1701.2@4705,4048.58 R1702.1@4705,3998.7 4733.8,3998.7 4737.3,4002.2 C1701.1@4760,4002.2 4782.7,4002.2 4782.7,4003.08 4794.66,4015.04 D1701.1@4815,4015.04 4818.94,4015.04 4834.17,3999.81 4830,3995.64 v1(4830,3977.4) ; v1(4780,522.4) 4800,542.4 LSP1701.1@4800,2437.4 4825,2462.4 v1(4825,3397.4)
  Bot Copper w8: v1(675,522.4) v1(4780,522.4) ; v1(4825,3397.4) 4830,3402.4 4830,3852.4 4845,3867.4 4845,3962.4 v1(4830,3977.4)
ADC_MCU_0_CH_1: C1705.1 D1703.1 JP2202.17 LSP1704.1 R1705.2 R1706.1 | length 8332.8
  Top Copper w8: JP2202.17@655.51,107.48 655.51,107.91 705,157.4 705,477.4 v1(725,497.4) ; v1(4870,497.4) 4900,527.4 LSP1704.1@4900,2437.4 4900,3262.4 v1(4940,3302.4) ; R1705.2@4910,4048.58 R1706.1@4910,3998.7 4940.8,3998.7 4942.3,3997.2 C1705.1@4965,3997.2 4987.7,3997.2 4998.04,4007.54 D1703.1@5022.5,4007.54 5022.5,3978.5 5052.35,3948.65 v1(5055,3948.65)
  Bot Copper w8: v1(725,497.4) v1(4870,497.4) ; v1(4940,3302.4) 5015,3377.4 5015,3822.4 5055,3862.4 v1(5055,3948.65)
ADC_MCU_0_CH_2: C1708.1 D1705.1 JP2202.20 LSP1705.1 R1709.2 R1710.1 | length 8279.2
  Top Copper w8: JP2202.20@555.51,207.48 555.51,222.91 555,457.4 v1(570,472.4) ; v1(4980,472.4) 5000,492.4 LSP1705.1@5000,2437.4 5000,3202.4 v1(5020,3222.4) ; R1709.2@5055,3808.58 R1710.1@5055,3753.7 5076.72,3753.7 5080.22,3757.2 C1708.1@5110,3757.2 5136.83,3757.2 5149.66,3770.04 D1705.1@5170,3770.04 5190.34,3770.04 5210,3750.38 v1(5210,3727.4)
  Bot Copper w8: v1(570,472.4) v1(4980,472.4) ; v1(5020,3222.4) 5210,3412.4 v1(5210,3727.4)
ADC_MCU_0_CH_3: C1702.1 D1702.1 JP2202.19 LSP1702.1 R1703.2 R1704.1 | length 8466.1
  Top Copper w8: JP2202.19@555.51,107.48 555.51,107.91 605,157.4 605,432.4 v1(620,447.4) ; R1703.2@4685,3803.58 R1704.1@4685,3753.7 4706.72,3753.7 4710.22,3757.2 C1702.1@4740,3757.2 4743.94,3757.2 4759.37,3772.63 4759.46,3772.54 D1702.1@4797.5,3772.54 4817.84,3772.54 4830,3760.38 4830,3462.4 5100,3192.4 LSP1702.1@5100,2437.4 5100,472.4 v1(5075,447.4) ; D1702.1@4797.5,3770.96 D1702.1@4797.5,3772.44
  Bot Copper w8: v1(620,447.4) v1(5075,447.4)
ADC_MCU_0_CH_4: C1706.1 D1704.1 JP2202.15 LSP1703.1 R1707.2 R1708.1 | length 8330.3
  Top Copper w8: JP2202.15@755.51,107.48 805,157.99 805,402.4 v1(825,422.4) ; R1707.2@4870,3808.58 R1708.1@4870,3761.22 4901.31,3761.22 4902.3,3762.2 C1706.1@4925,3762.2 4928.94,3762.2 4946.77,3780.04 D1704.1@4981.25,3780.04 5001.59,3780.04 5015,3766.63 5015,3317.4 5200,3132.4 LSP1703.1@5200,2437.4 5200,447.4 v1(5175,422.4)
  Bot Copper w8: v1(825,422.4) v1(5175,422.4)
ANALOG_IN_CH_0: R1701.1 X1701.2 | length 416.8
  Top Copper w8: R1701.1@4705,4103.7 4741.3,4103.7 4770,4132.4 4770,4392.4 4714.09,4448.31 X1701.2@4714.09,4449.17
ANALOG_IN_CH_1: R1705.1 X1701.4 | length 440.6
  Top Copper w8: R1705.1@4910,4103.7 4971.3,4103.7 5000,4132.4 5000,4402.64 X1701.4@4950.31,4449.17 ; R1705.1@4910,4107.14 R1705.1@4910.26,4107.4
ANALOG_IN_CH_2: R1709.1 X1701.6 | length 668.1
  Top Copper w8: R1709.1@5055,3863.7 5058.94,3863.7 5080,3884.76 5080,3957.4 5050,3987.4 5050,4200 5130,4280 5130,4395.79 X1701.6@5186.54,4449.17
ANALOG_IN_CH_3: R1703.1 X1701.8 | length 492.7
  Top Copper w8: R1703.1@4685,3862.14 4685,3882.4 4675,3892.4 4675,4179 4714.25,4218.25 X1701.8@4714.25,4334.41
ANALOG_IN_CH_4: R1707.1 X1701.10 | length 493.2
  Top Copper w8: R1707.1@4870,3867.14 4870,4202.4 4950.31,4282.72 X1701.10@4950.31,4327.12
CAN_1_H: D801.1 L801.4 LSP802.1 R802.2 X801.4 | length 1554.5
  Top Copper w18: L801.4@298.72,3500.72 207.28,3500.72 176.43,3531.57 176.43,3655 185.98,3664.56 R802.2@218,3664.56 218,3688 368,3838 368,4009.4 LSP802.1@250,4127.4 273.68,4151.09 273.68,4178.2 270.46,4181.42 285.1,4196.06 D801.1@285.1,4198.03 285.1,4200 245.1,4240 245.1,4325.1 310,4390 584.68,4390 X801.4@640.28,4334.41
CAN_1_L: D801.2 L801.1 LSP803.1 R801.1 X801.3 | length 989.1
  Top Copper w18: L801.1@389.28,3500.72 389.28,3569.28 404,3584 404,3654 393.44,3664.56 R801.1@357.07,3664.56 357.07,3790.06 390,3823 LSP803.1@390,4127.4 390,4165.96 359.9,4196.06 D801.2@359.9,4198.03 385.87,4198.03 X801.3@522.24,4334.41
CAN_1_RX: IC803.5 JP2201.20 LSP806.1 | length 4434
  Top Copper w8: IC803.5@425,2766.93 425,2729.46 450,2704.46 LSP806.1@450,2437.4 450,677.4 v1(455,672.4) ; v1(2310,672.4) 2327.17,655.23 JP2201.20@2327.17,207.48
  Bot Copper w8: v1(455,672.4) v1(2310,672.4)
CAN_1_SPLIT: C804.1 R801.2 R802.1 | length 139.9
  Top Copper w8: R802.1@218,3609.44 264.32,3609.44 265.3,3608.46 C804.1@288,3608.46 310.7,3608.46 311.69,3609.44 R801.2@357.07,3609.44
CAN_1_TRANS_STANDBY_CONTROL: JP2201.19 R806.2 | length 3928.6
  Top Copper w8: R806.2@788.82,2552.4 788.82,943.58 v1(810,922.4) ; v1(2255,922.4) 2280,897.4 2280,154.64 JP2201.19@2327.17,107.48
  Bot Copper w8: v1(810,922.4) v1(2255,922.4)
CAN_1_TX: IC803.3 JP2201.17 LSP805.1 | length 4663.7
  Top Copper w8: IC803.3@325,2766.93 325,2729.46 345,2709.46 LSP805.1@345,2437.4 345,727.4 v1(425,647.4) ; v1(2360,647.4) 2375,632.4 2375,159.64 JP2201.17@2427.17,107.48
  Bot Copper w8: v1(425,647.4) v1(2360,647.4)
CAN_TRANS_1_EXT_SUPPLY: C803.2 C805.2 C806.2 IC801.3 IC803.11 IC803.16 R803.1 | length 438.6
  Top Copper w8: IC803.16@225,3133.07 225,3170.54 221.46,3174.08 C806.2@221.46,3210.99 221.46,3233.69 240,3252.24 v1(240,3252.4) ; IC803.11@475,3133.07 475,3170.54 471.46,3174.08 C805.2@471.46,3210.99 471.46,3233.86 v1(490,3252.4) ; R803.1@702.56,3136.09 702.56,3167.46 v1(725,3189.9)
  Top Copper w24: C803.2@530,3872.6 530,3828.33 535.24,3823.09 IC801.3@535.24,3762.01 ; IC801.3@532.62,3776.63 IC801.3@534.94,3774.31 ; C803.2@532.62,3869.83 532.93,3870.14 C803.2@534.94,3870.14
  other v1: 480,3882.4 480,3917.4
CAN_TRANS_1_STANDBY: IC802.4 IC803.14 LSP804.1 R803.2 | length 547.5
  Top Copper w8: IC803.14@325,3133.07 325,3110.43 376.28,3059.15 IC802.4@667.1,3059.15 667.1,3094.72 647.44,3114.37 R803.2@647.44,3136.09 647.44,3157.81 626.77,3178.48 625,3178.48 LSP804.1@625,3202.17
CONTACTOR_6_COIL_POS: D1001.1 IC1001.5 X1201.3 | length 1526.5
  Top Copper w32: IC1001.5@3006.26,3075.51 IC1001.5@3006.26,3080.43 3006.26,3136.14
  Top Copper w40: D1001.1@3070,4316.65 3104.51,4316.65 3122.27,4334.41 X1201.3@3222.24,4334.41
  Bot Copper w32: 3006.26,3136.14 3006.26,3786.14 2975,3817.4 2975,4037.95 3222.2,4285.16 X1201.3@3222.2,4327.12
  other v1: 2985,3147.4 3025,3147.4
CONTACTOR_6_CONTROL: JP2201.8 LSP1001.1 R1001.2 | length 2394
  Top Copper w8: JP2201.8@2927.17,207.48 2927.17,1069.57 3040,1182.4 3040,2407.4 ; R1001.2@3037.56,2553.33 3037.56,2531.61 3040,2529.17 LSP1001.1@3040,2437.4 3040,2407.66 ; 3039.74,2392.31 3040,2392.57 3039.74,2392.57
CONTACTOR_6_FEEDBACK: IC1102.14 JP2201.7 LSP1101.1 | length 3284.7
  Top Copper w8: JP2201.7@2927.17,107.48 2980,160.31 2980,727.4 v1(3000,747.4) ; IC1102.14@3431.26,2771.64 3431.26,2598.74 3550,2480 LSP1101.1@3550,2437.4 3550,762.4 v1(3535,747.4)
  Bot Copper w8: v1(3000,747.4) v1(3535,747.4)
CONTACTOR_6_FEEDBACK_EXT: R1101.2 X1201.2 | length 561.9
  Top Copper w8: X1201.2@3340.32,4449.17 3341.91,4450.77 3343.46,4452.32 3500.08,4452.32 3525,4427.4 3525,4147.4 3495,4117.4 3480,4117.4 3470,4107.4 R1101.2@3470,4093.4
CONTACTOR_7_COIL_POS: D1002.1 IC1002.5 X1202.3 | length 1513.8
  Top Copper w32: IC1002.5@2731.26,3075.51 IC1002.5@2731.26,3080.43 2731.26,3128.66
  Top Copper w40: D1002.1@2645,4316.65 2679.51,4316.65 2697.27,4334.41 X1202.3@2797.24,4334.41
  Bot Copper w32: 2730,3152.4 2730,3637.4 2805,3712.4 2900,3812.4 2905,4087.4 2855,4137.4 2835,4137.4 2795,4177.4 2795,4222.56 X1202.3@2797.2,4327.12
  other v1: 2710,3147.4 2750,3147.4
CONTACTOR_7_CONTROL: JP2201.10 LSP1002.1 R1004.2 | length 2370.9
  Top Copper w8: R1004.2@2767.56,2553.33 2767.56,2531.61 2770,2529.17 LSP1002.1@2770,2437.4 2770,2407.66 2769.74,2407.4 2770,2407.4 2827.17,2350.23 JP2201.10@2827.17,207.48
CONTACTOR_7_FEEDBACK: IC1102.13 JP2201.9 LSP1103.1 | length 3193.3
  Top Copper w8: JP2201.9@2827.17,107.48 2880,160.31 2880,752.4 v1(2900,772.4) ; IC1102.13@3381.26,2771.64 3381.26,2496.14 3400,2477.4 LSP1103.1@3400,2437.4 3400,787.4 v1(3385,772.4)
  Bot Copper w8: v1(2900,772.4) v1(3385,772.4)
CONTACTOR_7_FEEDBACK_EXT: R1102.2 X1202.2 | length 993.5
  Top Copper w8: R1102.2@3410,4093.4 3410,4123.4 3419,4132.4 3480,4132.4 3510,4162.4 3510,4392.4 v1(3500,4402.4)
  Bot Copper w8: X1202.2@2915.32,4449.17 2965.24,4402.4 v1(3500,4402.4)
CONTACTOR_8_COIL_POS: D1003.1 IC1003.5 X1203.3 | length 1464.5
  Top Copper w32: IC1003.5@2456.26,3075.51 IC1003.5@2456.26,3080.43 2456.26,3143.66
  Top Copper w40: D1003.1@2225,4321.65 2259.51,4321.65 2272.27,4334.41 X1203.3@2372.24,4334.41
  Bot Copper w32: X1203.3@2372.2,4327.12 2375,4221.97 2375,4192.4 2451.27,4116.13 2450,3162.4 v1(2435,3147.4) ; 2455,3162.4 2460,3162.4 v1(2475,3147.4)
CONTACTOR_8_CONTROL: JP2202.16 LSP1003.1 R1007.2 | length 4058.2
  Top Copper w8: JP2202.16@755.51,207.48 755.51,872.91 v1(780,897.4) ; v1(2475,897.4) 2490,912.4 LSP1003.1@2490,2437.4 2490,2529.17 2487.56,2531.61 R1007.2@2487.56,2553.33
  Bot Copper w8: v1(780,897.4) v1(2475,897.4)
CONTACTOR_8_FEEDBACK: IC1102.12 JP2202.13 LSP1102.1 | length 5174.1
  Top Copper w8: JP2202.13@855.51,107.48 905,156.97 905,782.4 v1(920,797.4) ; v1(3325,797.4) 3340,812.4 3340,1102.4 3250,1192.4 LSP1102.1@3250,2437.4 3250,2475 3331.25,2556.25 IC1102.12@3331.25,2772.73
  Bot Copper w8: v1(920,797.4) v1(3325,797.4)
CONTACTOR_8_FEEDBACK_EXT: R1103.2 X1203.2 | length 1441.8
  Top Copper w8: X1203.2@2490.32,4449.17 2490.08,4452.32 2540,4402.4 3465,4402.4 3495,4372.4 3495,4177.4 3465,4147.4 3360,4147.4 3350,4137.4 R1103.2@3350,4093.4
CONTACTOR_FEEDBACK_SUPPLY_EXT: C1103.1 C1104.1 IC1101.1 IC1102.1 R1104.2 R1105.2 R1106.2 | length 383.6
  Top Copper w8: v1(3230,3240) 3248.52,3240 3255.92,3247.4 R1106.2@3273.7,3247.4 ; v1(3312.5,3347.4) 3323.7,3336.2 R1105.2@3323.7,3302.4 ; R1104.2@3506,3332.4 v1(3545,3332.4) ; IC1102.1@3531.25,3127.07 3531.25,3198.75 3528.54,3201.46 C1104.1@3528.54,3240 3528.54,3262.7 3545,3279.16 v1(3545,3282.4)
  Top Copper w16: C1103.1@3296.26,3535.94 3296.26,3554.71 3297.19,3555.64 IC1101.1@3297.19,3620.47
  other v1: 3245,3532.4
CONTACTORS_COMMON_NEG: D1001.2 D1002.2 D1003.2 T901.4 X1201.4 X1202.4 X1203.4
DATA_STORAGE_SPI_Memorycard_NSS: JP2201.1 LSP1502.1 R1506.1 SLOT1501.2 | length 6869.6
  Top Copper w8: JP2201.1@3227.17,107.48 3275,155.31 3275,352.4 v1(3295,372.4) ; v1(5400,4032.4) 5423.74,4032.4 5428.74,4027.4 ; R1506.1@5428.74,3923.4 5428.74,4027.4 ; v1(5455,372.4) 5475,392.4 LSP1502.1@5475,2437.4 v1(5475,2512.4) ; SLOT1501.2@5617.93,4531.43 5617.93,4477.93 5428.74,4288.74 5428.74,4027.4
  Bot Copper w8: v1(3295,372.4) v1(5455,372.4) ; v1(5400,4032.4) 5400,3987.4 5475,3912.4 v1(5475,2512.4)
DATA_STORAGE_SPI_MISO: JP2201.3 LSP1505.1 R1507.1 SLOT1501.7 | length 7265.6
  Top Copper w8: JP2201.3@3127.17,107.48 3175,155.31 3175,277.4 v1(3195,297.4) ; R1507.1@5703.74,3919.96 5703.74,3976.14 v1(5705,3977.4) 5705,4348.47 5834.46,4477.94 SLOT1501.7@5834.46,4547.17 ; v1(5730,297.4) 5745,312.4 5745,1832.4 5900,1987.4 LSP1505.1@5900,2437.4 5850,2487.4 v1(5850,2512.4)
  Bot Copper w8: v1(3195,297.4) v1(5730,297.4) ; v1(5705,3977.4) 5705,3947.4 5850,3802.4 v1(5850,2512.4)
DATA_STORAGE_SPI_MOSI: JP2201.5 LSP1503.1 R1504.1 SLOT1501.3 | length 7236.7
  Top Copper w8: JP2201.5@3027.17,107.48 3075,154.64 3075,327.4 v1(3095,347.4) ; v1(5460,4002.4) 5488.74,4002.4 ; R1504.1@5488.74,3923.4 5488.74,4002.4 ; v1(5600,2512.4) 5625,2487.4 LSP1503.1@5625,2437.4 5625,362.4 v1(5610,347.4) ; SLOT1501.3@5661.24,4547.17 5661.24,4481.24 5488.74,4308.74 5488.74,4002.4
  Bot Copper w8: v1(3095,347.4) v1(5610,347.4) ; v1(5460,4002.4) 5460,3967.4 5600,3827.4 v1(5600,2512.4)
DATA_STORAGE_SPI_SCK: JP2201.6 LSP1504.1 R1505.2 SLOT1501.5 | length 7238
  Top Copper w8: JP2201.6@3027.17,207.48 3027.17,304.57 v1(3045,322.4) ; R1505.2@5571.26,3919.96 5612.96,3919.96 5620.4,3927.4 v1(5655,3927.4) ; R1505.2@5571.26,3923.4 5571.26,4302.96 5747.85,4479.55 SLOT1501.5@5747.85,4547.17 ; v1(5685,322.4) 5700,337.4 5700,1877.4 5775,1952.4 LSP1504.1@5775,2437.4 5725,2487.4 v1(5725,2512.4)
  Bot Copper w8: v1(3045,322.4) v1(5685,322.4) ; v1(5655,3927.4) 5725,3857.4 v1(5725,2512.4)
GND_0: C807.1 C1105.2 C1106.2 C1306.2 C1501.1 C1502.2 C1701.2 C1702.2 C1703.2 C1704.2 C1705.2 C1706.2 C1707.2 C1708.2 C1905.2 C1907.2 D1701.2 D1702.2 D1703.2 D1704.2 D1705.2 IC803.2 IC803.7 IC803.8 IC1102.9 IC1102.15 IC1303.2 IC1303.8 IC1701.1 IC1701.2 IC1902.9 IC1902.15 IC1903.9 IC1903.15 JP2201.22 JP2201.24 JP2202.22 JP2202.24 LSP2102.1 R805.2 R1002.1 R1005.1 R1008.1 R1505.1 R1702.2 R1704.2 R1706.2 R1708.2 R1710.2 R2003.1 R2004.1 R2009.1 R2010.1 R2015.1 R2016.1 SLOT1501.6 SLOT1501.6_1 SLOT1501.SH SV2101.3 SV2101.4 T801.S T1001.S T1002.S T1003.S T2001.S T2002.S T2003.S T2004.S T2005.S T2006.S X1701.11 X1701.12 | length 5360.6
  Top Copper w6: C1501.1@5598.54,4033.66 5598.54,3998.86 v1(5605,3992.4) ; SLOT1501.SH@5621.47,4119.61 5621.47,4151.17 5620.47,4152.18 5620.47,4193.47 v1@5622,4191.94 ; SLOT1501.6_1@5791.16,4110.76 5791.16,4056.24 v1(5792.5,4054.9) ; v1(5842,4192) 5845.88,4188.12 SLOT1501.SH@5845.88,4119.61 ; SLOT1501.SH@5908.87,4631.43 5965.97,4631.43 v1(5967.5,4629.9)
  Top Copper w8: IC803.2@275,2766.93 275,2715.25 278.54,2711.71 C807.1@278.54,2689.01 278.54,2666.31 297.45,2647.4 v1(305,2647.4) ; IC803.7@525,2766.93 525,2729.46 542.5,2711.96 582.94,2711.96 v1(592.5,2702.4) 592.5,2711.96 575,2729.46 IC803.8@575,2766.93 ; R805.2@788.82,2607.4 788.82,2629.12 799.9,2640.2 T801.S@799.9,2665.16 815.71,2665.16 827.96,2677.4 v1(855,2677.4) ; IC1303.2@1011.25,2777.28 1011.25,2711.64 1018.54,2704.34 C1306.2@1018.54,2681.64 1018.54,2601.46 v1(1030,2590) ; v1(1311.25,2702.4) IC1303.8@1311.25,2777.28 IC1303.8@1311.25,2779.15 ; v2(1500,2700) IC1902.9@1500,2776.03 ; v1(1785,2652.4) 1797.72,2665.12 C1905.2@1797.72,2697.4 1797.72,2720.1 1800,2722.38 IC1902.15@1800,2776.03 ; v1(1923.75,2702.4) 1925,2703.65 IC1903.9@1925,2776.03 ; v1(2210,2652.4) 2210,2666.98 2217.72,2674.7 C1907.2@2217.72,2697.4 2217.72,2720.1 2224.37,2726.76 2225,2726.76 IC1903.15@2225,2776.03 ; R1008.1@2365,2687.14 v1(2365,2727.4) ; T1003.S@2493.65,2621.41 2521.51,2621.41 v1(2533.75,2633.65) ; R1005.1@2645,2687.14 v1(2645,2732.4) ; T1002.S@2774.9,2621.41 2802.76,2621.41 v1(2815,2633.65) ; R1002.1@2915,2687.14 v1(2915,2732.4) ; T1001.S@3043.65,2621.41 3071.51,2621.41 v1(3083.75,2633.65) ; v1(3170,2642.4) 3177.72,2650.12 C1105.2@3177.72,2687.4 3177.72,2710.1 3181.25,2713.63 IC1102.9@3181.25,2772.73 ; v1(3470,2642.4) 3476.46,2648.86 C1106.2@3476.46,2687.4 3476.46,2710.1 3481.25,2714.89 IC1102.15@3481.25,2772.73 ; R2003.1@3926.3,2047.1 3926.3,2068.81 3936.14,2078.66 T2001.S@3936.14,2141.41 3952.28,2141.41 3979.96,2169.09 4010.21,2169.09 4037.9,2141.41 T2003.S@4069.89,2141.41 ; R2009.1@4060.05,2047.1 4060.05,2068.81 4069.89,2078.66 T2003.S@4069.89,2141.41 ; R2015.1@4193.8,2047.1 4193.8,2073.8 4203.64,2083.64 T2005.S@4203.64,2141.41 ; v2(4247.46,2252.54) 4247.46,2169.09 ; R2004.1@4327.55,2047.1 4327.55,2068.81 4337.39,2078.66 T2002.S@4337.39,2141.41 ; R2010.1@4461.3,2047.1 4461.3,2088.3 4471.14,2098.14 T2004.S@4471.14,2141.41 ; R2016.1@4595.05,2047.1 4595.05,2075.05 4604.89,2084.89 T2006.S@4604.89,2141.41 4572.9,2141.41 4545.21,2169.09 4514.96,2169.09 4487.28,2141.41 T2004.S@4471.14,2141.41 ; v1(4685,3657.4) R1704.2@4685,3695.14 ; R1702.2@4705,3940.14 4705,3907.4 4715,3897.4 v1(4735,3897.4) 4760,3922.4 C1701.2@4760,3942.66 ; v1(4740,3657.4) C1702.2@4740,3700.12 4778.19,3700.12 4793.56,3684.74 D1702.2@4797.5,3684.74 ; v1(4810,3887.4) 4815,3892.4 D1701.2@4815,3927.24 D1701.2@4815,3927.34 ; v1(4870,3657.4) R1708.2@4870,3706.1 ; R1706.2@4910,3940.14 4910,3902.4 v1(4920,3892.4) 4920,3899.05 4961.06,3940.12 C1705.2@4965,3940.12 ; v1(4925,3657.4) C1706.2@4925,3702.66 ; C1706.2@4925,3705.12 4948.04,3705.12 4960.91,3692.24 D1704.2@4981.25,3692.24 ; C1705.2@4965,3937.4 C1705.2@4965,3937.66 ; v1(5010,3882.4) 5022.5,3894.9 D1703.2@5022.5,3919.74 D1703.2@5022.5,3919.84 ; v1(5055,3652.4) R1710.2@5055,3695.14 ; v1(5110,3652.4) C1708.2@5110,3700.12 5148.19,3700.12 5166.06,3682.24 D1705.2@5170,3682.24 ; v1(5386.25,4604.9) 5393.13,4611.78 SLOT1501.SH@5393.13,4678.67 ; R1505.1@5571.26,3864.84 5592.98,3864.84 5605.14,3877 v1(5636,3877) ; C1501.1@5598.54,4033.66 5623.66,4033.66 5670,4080 5670,4360 5791.16,4481.16 SLOT1501.6@5791.16,4555.05 ; C1502.2@5650,3756 v1(5650,3808) ; v1(5875,1282.4) LSP2102.1@5875,1337.4 ; T2003.S@4069.89,2141.41 4086.03,2141.41 4113.71,2169.09 4143.96,2169.09 4171.65,2141.41 T2005.S@4203.64,2141.41 ; T2005.S@4203.64,2141.41 4219.78,2141.41 4247.46,2169.09 ; 4247.46,2169.09 4277.71,2169.09 4305.4,2141.41 T2002.S@4337.39,2141.41 ; T2002.S@4337.39,2141.41 4353.53,2141.41 4381.21,2169.09 4411.46,2169.09 4439.15,2141.41 T2004.S@4471.14,2141.41
  Top Copper w24: v1(5080,4180) C1704.2@5080,4119.68 C1703.2@5130,4119.68 5152.7,4119.68 5170.42,4137.4 IC1701.1@5203,4137.4 IC1701.2@5203,4100
  Top Copper w32: v1(5285,4262.4) C1707.2@5285,4307.66
  other v1: 5622,4195
GND_EXT_0: C1101.2 C1102.2 C1103.2 C1104.2 C1901.2 C1902.2 C1903.2 C1904.2 C1906.2 D1101.2 D1102.2 D1103.2 D1901.2 D1902.2 D1903.2 D1904.2 IC1101.2 IC1102.2 IC1102.8 IC1901.2 IC1902.2 IC1902.8 IC1903.2 IC1903.8 R1903.1 R1904.1 R1907.1 R1908.1 SV901.8 X1201.1 X1202.1 X1203.1 X1901.9 X1901.10 | length 1757.2
  Top Copper w8: IC1902.8@1500,3136.27 1500,3205 v1(1510,3215) ; v1(1570,3330) 1566.24,3330 1546.09,3350.15 D1902.2@1546.09,3358.02 D1901.2@1625,3358.02 1625,3350.15 1635.39,3339.76 1635.39,3321.11 1652.56,3303.94 R1903.1@1652.56,3300 R1904.1@1652.56,3250 1652.56,3222.44 v1(1670,3205) ; D1904.2@1703.91,3358.02 D1903.2@1782.82,3358.02 1795.67,3358.02 1801.25,3352.44 v1(1801.25,3321.15) ; IC1902.2@1800,3136.27 1800,3185.54 1802.72,3188.26 C1903.2@1802.72,3227.4 1802.72,3269.68 v1(1800,3272.4) ; IC1903.8@1925,3134.4 IC1903.8@1925,3136.27 1925,3219.9 v1(1932.5,3227.4) ; v1(2080,3340) 2080,3318.77 2087.56,3311.21 R1907.1@2087.56,3289.5 2087.56,3245.38 2086.3,3244.12 R1908.1@2086.3,3222.4 ; IC1903.2@2225,3136.27 2225,3185.54 2226.7,3185.54 2246.46,3205.3 C1906.2@2246.46,3228 v1(2246.46,3280) ; IC1102.8@3181.25,3128.15 IC1102.8@3181.25,3127.07 3181.25,3062.4 3187.5,3056.15 3475,3056.15 3481.25,3062.4 IC1102.2@3481.25,3127.07 3481.25,3207.51 3471.46,3217.3 C1104.2@3471.46,3240 3471.46,3278.86 v1(3475,3282.4)
  GND w8: v1@1565,3335 v1(1570,3330)
  Bot Copper w8: v1(1510,3215) 1510,3229.9 1570,3289.9 v1(1570,3330)
  other v1: 2285,3417.4 3260,3432.4 3295,3432.4 3345,3432.4 3380,3432.4 2285,3452.4 2285,3502.4 2285,3537.4
GND_EXT_1: C801.1 C802.1 C803.1 C804.2 C805.1 C806.1 D801.3 IC801.2 IC802.3 IC803.9 IC803.10 IC803.15 LSP801.1 X801.1 | length 542.6
  Top Copper w8: LSP801.1@255,4457.4 v1(315,4457.4) ; IC803.15@275,3133.07 275,3184.75 278.54,3188.29 C806.1@278.54,3210.99 278.54,3233.69 297.25,3252.4 v1(305,3252.4) ; C804.2@288,3665.54 v1(288,3707) ; v1(321.25,4319.9) 322.5,4319.9 D801.3@322.5,4276.77 ; IC803.10@525,3133.07 525,3184.75 ; v1(550,3252.4) 531.3,3233.69 528.54,3233.69 C805.1@528.54,3210.99 528.54,3188.29 525,3184.75 ; IC803.9@575,3133.07 575,3155.71 545.96,3184.75 525,3184.75 ; v1(725,3064.9) 730.75,3059.15 IC802.3@767.1,3059.15
  other v1: 700,4002.4 700,4042.4 505,4062.4 545,4062.4
GND_EXT_2: R901.2 SV901.2 SV901.4 SV901.6 T901.3
GND_EXT_3: C1301.2 C1302.2 C1303.2 C1304.2 C1305.2 IC1301.2 IC1302.5 IC1303.9 IC1303.15 X1301.1 X1301.6 | length 414.1
  Top Copper w8: v1(1300,3220) 1311.25,3208.75 IC1303.9@1311.25,3137.52
  Top Copper w10: IC1303.15@1011.25,3137.52 1011.25,3186.79 1029.8,3205.35 C1305.2@1029.8,3232.4 1029.8,3282.2 v1(1030,3282.4) ; v1(1180,3680) 1180,3648.98 1158.54,3627.53 C1304.2@1158.54,3623.59 1158.54,3619.65 1173.97,3604.22 1185.5,3604.22 1212.5,3577.23 IC1302.5@1212.5,3543.7
  other v1: 1075,4072.4 1115,4072.4 1155,4072.4
INTERLOCK_STATUS: LSP901.1 R902.2 SV901.7 | length 375.1
  Top Copper w18: R902.2@2447.56,3857.4 2447.56,3853.46 2501.45,3799.57 v3(2527.17,3799.57) 2527.6,3800 LSP901.1@2630,3800
  Bot Copper w8: v3(2527.17,3799.57) SV901.7@2527.17,3965.75
ISO_GPIO_MCU_0_IN_0: IC1902.14 JP2202.4 LSP1903.1 | length 3053.6
  Top Copper w8: JP2202.4@1355.51,207.48 1355.51,732.91 v1(1370,747.4) ; IC1902.14@1750,2776.03 1750,2557.4 1825,2482.4 LSP1903.1@1825,2437.4 1825,762.4 v1(1810,747.4) ; IC1902.14@1750,2777.9 IC1902.14@1751.26,2776.64
  Bot Copper w8: v1(1370,747.4) v1(1810,747.4)
ISO_GPIO_MCU_0_IN_0_EXT: R1901.2 X1901.5 | length 1430.4
  Top Copper w8: R1901.2@1625,3563.4 1625,3637.4 1615,3647.4 1550,3647.4 1540,3657.4 1540,4257.4 1560,4277.4 1990,4277.4 2015,4302.4 2015,4399.84 X1901.5@2067.48,4449.17
ISO_GPIO_MCU_0_IN_1: IC1902.13 JP2202.1 LSP1901.1 | length 2903.4
  Top Copper w8: JP2202.1@1455.51,107.48 1460.08,107.48 1505,152.4 1505,752.4 v1(1525,772.4) ; IC1902.13@1700,2776.03 1700,2527.4 1725,2502.4 LSP1901.1@1725,2437.4 1725,787.4 v1(1710,772.4) ; IC1902.13@1700,2777.9 IC1902.13@1701.26,2776.64
  Bot Copper w8: v1(1525,772.4) v1(1710,772.4)
ISO_GPIO_MCU_0_IN_1_EXT: R1902.2 X1901.6 | length 836.5
  Top Copper w8: R1902.2@1575,3563.4 1575,3618.65 1561.25,3632.4 1540,3632.4 1525,3647.4 1525,4262.4 1595.04,4332.44 X1901.6@1595.04,4327.12
ISO_GPIO_MCU_0_IN_2: IC1903.14 JP2201.11 LSP1905.1 | length 3199.3
  Top Copper w8: IC1903.14@2175,2776.03 2175,2577.4 2275,2477.4 LSP1905.1@2275,2437.4 2275,962.4 v1(2310,927.4) ; IC1903.14@2175,2777.9 IC1903.14@2176.26,2776.64 ; JP2201.11@2727.17,107.48 2775,155.31 2775,907.4 v1(2755,927.4)
  Bot Copper w8: v1(2310,927.4) v1(2755,927.4)
ISO_GPIO_MCU_0_IN_2_EXT: R1905.2 X1901.7 | length 1109
  Top Copper w8: v1(1762.5,3637.4) 1770,3629.9 R1905.2@1770,3563.4
  Bot Copper w8: X1901.7@1713.15,4327.12 1660,4277.4 1560,4277.4 1540,4257.4 1540,3657.4 1547.4,3650 1749.9,3650 v1(1762.5,3637.4)
ISO_GPIO_MCU_0_IN_3: IC1903.13 JP2201.16 LSP1907.1 | length 2923.8
  Top Copper w8: IC1903.13@2125,2776.03 2125,2542.4 2175,2492.4 LSP1907.1@2175,2437.4 2175,792.4 v1(2195,772.4) ; IC1903.13@2125,2777.9 IC1903.13@2126.26,2776.64 ; v1(2510,772.4) 2530,752.4 2530,210.31 JP2201.16@2527.17,207.48
  Bot Copper w8: v1(2195,772.4) v1(2510,772.4)
ISO_GPIO_MCU_0_IN_3_EXT: R1906.2 X1901.8 | length 1317.3
  Top Copper w8: v1(1712.5,3624.9) 1720,3617.4 R1906.2@1720,3563.4
  Bot Copper w8: v1(1712.5,3624.9) 1705,3632.4 1540,3632.4 1525,3647.4 1525,4357.4 1555,4387.4 1778.07,4387.4 1827.64,4331.22 X1901.8@1831.26,4327.12
ISO_GPIO_MCU_0_OUT_0: IC1902.12 JP2201.15 LSP1904.1 | length 3531.8
  Top Copper w8: v1(1645,847.4) 1625,867.4 LSP1904.1@1625,2437.4 1625,2507.4 1650,2532.4 IC1902.12@1650,2776.03 ; IC1902.12@1650,2777.9 IC1902.12@1651.26,2776.64 ; v1(2460,847.4) 2480,827.4 2480,154.64 JP2201.15@2527.17,107.48
  Bot Copper w8: v1(1645,847.4) v1(2460,847.4)
ISO_GPIO_MCU_0_OUT_0_EXT: IC1902.5 R1903.2 X1901.1 | length 1442.3
  Top Copper w8: X1901.1@1595.04,4449.17 1530.12,4387.4 1530,4387.4 1510,4367.4 1510,3639.9 1520,3629.9 1520,3317.4 1537.4,3300 R1903.2@1597.44,3300 1597.44,3296.06 1625,3268.5 1625,3210.54 1650,3185.54 IC1902.5@1650,3136.27
ISO_GPIO_MCU_0_OUT_1: IC1902.11 JP2201.12 LSP1902.1 | length 3784.7
  Top Copper w8: v1(1540,872.4) 1525,887.4 LSP1902.1@1525,2437.4 1525,2532.4 1600,2607.4 IC1902.11@1600,2776.03 ; IC1902.11@1600,2777.9 IC1902.11@1601.26,2776.64 ; v1(2710,872.4) 2727.17,855.23 JP2201.12@2727.17,207.48
  Bot Copper w8: v1(1540,872.4) v1(2710,872.4)
ISO_GPIO_MCU_0_OUT_1_EXT: IC1902.6 R1904.2 X1901.2 | length 1688.2
  Top Copper w8: IC1902.6@1600,3136.27 1600,3225.72 1597.44,3228.28 R1904.2@1597.44,3250 1530,3250 1495,3285 1495,4477.4 1515,4497.4 1695,4497.4 1713.15,4479.25 X1901.2@1713.15,4449.17
ISO_GPIO_MCU_0_OUT_2: IC1903.12 JP2201.13 LSP1906.1 | length 3276.7
  Top Copper w8: IC1903.12@2075,2776.03 LSP1906.1@2075,2437.4 2075,762.4 v1(2090,747.4) ; IC1903.12@2075,2777.9 IC1903.12@2076.26,2776.64 ; JP2201.13@2627.17,107.48 2680,160.31 2680,727.4 v1(2660,747.4)
  Bot Copper w8: v1(2090,747.4) v1(2660,747.4)